# Altium PCB 6-layer.PcbDoc (part 2 of 2)
Units mm, origin at the board's own origin, x right, y up, seen from the top; angles counter-clockwise.
Board outline 36 x 29 mm, 6 copper layers (Top Layer, GND1, L3, L4, GND2, Bottom Layer), stack 0.804 mm thick; 122 components, 171 nets, 723 pads, 118 vias.
Unrouted connection lines stored in the file: 463.
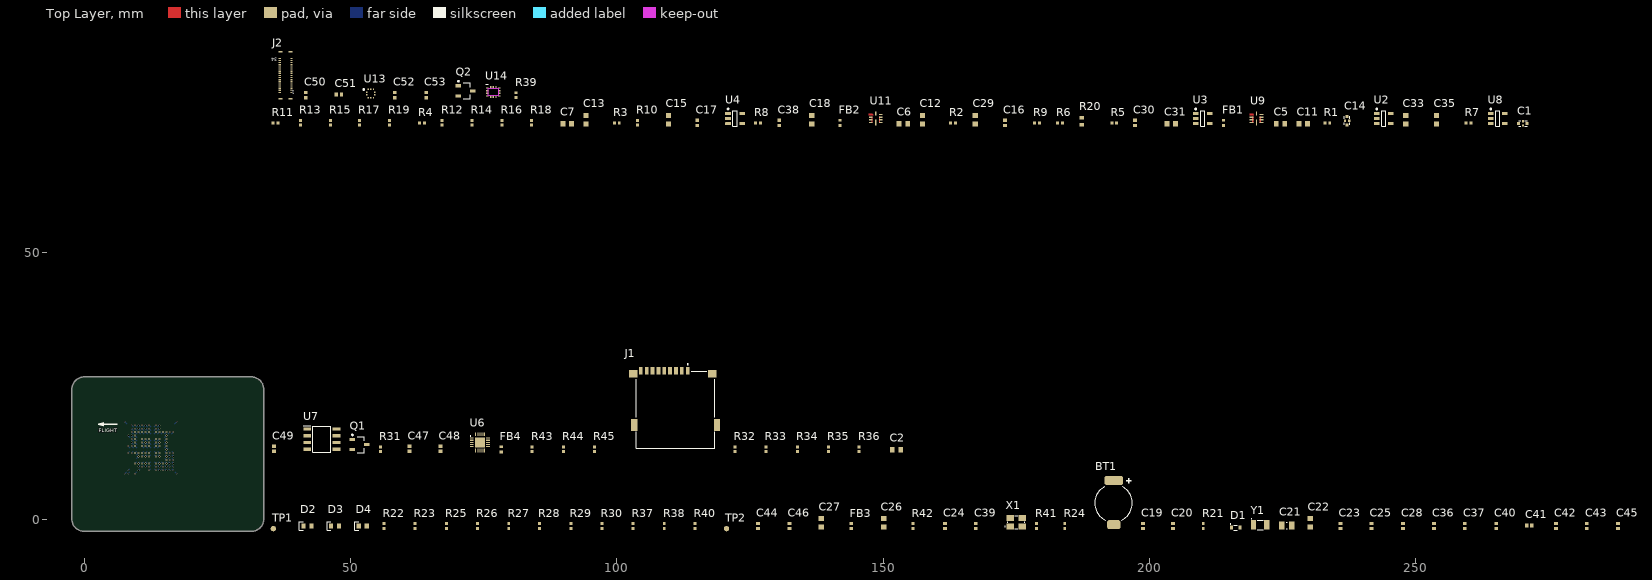
[diagram p0: Top Layer view]

## Polygon pours and split planes (outlines as drawn)
GND on GND1 (split plane): 31.576,26.183 31.75,26.157 31.92,26.114 32.086,26.055 32.245,25.98 32.395,25.89 32.537,25.785 32.667,25.667 32.785,25.537 32.89,25.395 32.98,25.245 33.055,25.086 33.114,24.92 33.157,24.75 33.183,24.576 33.191,24.414 33.19,24.4 33.19,0 33.191,-0.014 33.183,-0.176 33.157,-0.35 33.114,-0.52 33.055,-0.686 32.98,-0.845 32.89,-0.995 32.785,-1.137 32.667,-1.267 32.537,-1.385 32.395,-1.49 32.245,-1.58 32.086,-1.655 31.92,-1.714 31.75,-1.757 31.576,-1.783 31.414,-1.791 31.4,-1.79 0,-1.79 -0.014,-1.791 -0.176,-1.783 -0.35,-1.757 -0.52,-1.714 -0.686,-1.655 -0.845,-1.58 -0.995,-1.49 -1.137,-1.385 -1.267,-1.267 -1.385,-1.137 -1.49,-0.995 -1.58,-0.845 -1.655,-0.686 -1.714,-0.52 -1.757,-0.35 -1.783,-0.176 -1.791,-0.014 -1.79,0 -1.79,24.4 -1.791,24.414 -1.783,24.576 -1.757,24.75 -1.714,24.92 -1.655,25.086 -1.58,25.245 -1.49,25.395 -1.385,25.537 -1.267,25.667 -1.137,25.785 -0.995,25.89 -0.845,25.98 -0.686,26.055 -0.52,26.114 -0.35,26.157 -0.176,26.183 -0.014,26.191 0,26.19 31.4,26.19 31.414,26.191
no net on GND2 (split plane): 31.576,26.183 31.75,26.157 31.92,26.114 32.086,26.055 32.245,25.98 32.395,25.89 32.537,25.785 32.667,25.667 32.785,25.537 32.89,25.395 32.98,25.245 33.055,25.086 33.114,24.92 33.157,24.75 33.183,24.576 33.191,24.414 33.19,24.4 33.19,0 33.191,-0.014 33.183,-0.176 33.157,-0.35 33.114,-0.52 33.055,-0.686 32.98,-0.845 32.89,-0.995 32.785,-1.137 32.667,-1.267 32.537,-1.385 32.395,-1.49 32.245,-1.58 32.086,-1.655 31.92,-1.714 31.75,-1.757 31.576,-1.783 31.414,-1.791 31.4,-1.79 0,-1.79 -0.014,-1.791 -0.176,-1.783 -0.35,-1.757 -0.52,-1.714 -0.686,-1.655 -0.845,-1.58 -0.995,-1.49 -1.137,-1.385 -1.267,-1.267 -1.385,-1.137 -1.49,-0.995 -1.58,-0.845 -1.655,-0.686 -1.714,-0.52 -1.757,-0.35 -1.783,-0.176 -1.791,-0.014 -1.79,0 -1.79,24.4 -1.791,24.414 -1.783,24.576 -1.757,24.75 -1.714,24.92 -1.655,25.086 -1.58,25.245 -1.49,25.395 -1.385,25.537 -1.267,25.667 -1.137,25.785 -0.995,25.89 -0.845,25.98 -0.686,26.055 -0.52,26.114 -0.35,26.157 -0.176,26.183 -0.014,26.191 0,26.19 31.4,26.19 31.414,26.191

## Other copper
Top Layer:
  region net FMU_VDD_5V: 218.811,76.083 219.486,76.083 219.611,75.958 219.611,75.833 218.811,75.833
  region net FMU_VDD_5V: 147.311,76.083 147.986,76.083 148.111,75.958 148.111,75.833 147.311,75.833

## Silkscreen, mask and mechanical layers (free items; w line width, h text height)
Top Overlay:
  lines w0.26: 6.204,17.8 2.6,17.8 ; 2.6,17.8 3.55,17.5 3.55,18.1 2.6,17.8
  text "FLIGHT" at 2.7,16.35 h0.66
Bottom Overlay:
  the board outline again, w0.2
Mechanical 1:
  lines w0.1: -2.3,0 ccw(c0,0) 0,-2.3 ; -2.3,0 ccw(c0,0) 0,-2.3 ; -2.3,0 -2.3,24.4 ; -2.3,0 -2.3,24.4 ; -2.3,24.4 cw(c0,24.4) 0,26.7 ccw(c0,24.4) -2.3,24.4 ; 0,-2.3 31.4,-2.3 ; 0,-2.3 31.4,-2.3 ; 31.4,-2.3 ccw(c31.4,0) 33.7,0 ; 31.4,-2.3 ccw(c31.4,0) 33.7,0 ; 33.7,0 33.7,24.4 ; 33.7,0 33.7,24.4 ; 33.7,24.4 ccw(c31.4,24.4) 31.4,26.7 cw(c31.4,24.4) 33.7,24.4 ; 0,26.7 31.4,26.7 0,26.7
Top Assembly:
  text "-PCB stackup follows JLCPCB JLC06081H-1080A, ~0.8mm. / -All traces routed microstrip, 0.1072mm trace width. / -1.5W clearance for UART, SPI, I2C, and other GPIOs. 2W for RMII and SDIO. 3W for clocks." at -2.1,28.681 h0.6
Bottom Assembly:
  lines w0.12: -0.23,6.44 1.63,6.44 1.63,17.96 -0.23,17.96 -0.23,6.44 ; 0.101,7.07 0.672,7.4 0.101,7.73 0.101,7.07 ; 25.67,1.44 25.67,22.96 27.53,22.96 27.53,1.44 25.67,1.44 ; 26.345,2.4 27.241,1.882 27.241,2.917 26.345,2.4
Bottom Component Outline:
  lines w0.025: -0.225,6.44 1.625,6.44 1.625,17.96 -0.225,17.96 -0.225,6.44 ; 25.675,1.44 25.675,22.96 27.525,22.96 27.525,1.44 25.675,1.44
Bottom Designator:
  text ".Designator" at 0.7,12.2 h1.2 r270
  text ".Designator" at 26.6,12.2 h1.2 r270

## Text inside footprints (layer, text, board x,y; h text height)
D2: Mechanical 13 "+" at 43.228,-0.684 h0.5
D3: Mechanical 13 "+" at 48.428,-0.684 h0.5
D4: Mechanical 13 "+" at 53.628,-0.684 h0.5
Designator7: Mechanical 1 "50" at -1.989,17.727 h0.6 r270; Mechanical 1 "49" at 3.011,17.72 h0.6 r270; Mechanical 1 "100" at 23.911,21.687 h0.6 r270; Mechanical 1 "99" at 28.911,21.823 h0.6 r270
J2: Top Overlay "1" at 39.562,80.408 h0.6 r180; Top Overlay "34" at 36.237,86.608 h0.6 r180